# Altium PCB MiniPC.PcbDoc (part 20 of 24)
Units mm, origin at the board's own origin, x right, y up, seen from the top; angles counter-clockwise.
Board outline 175 x 155 mm, 16 copper layers (1_Top, 2_int1_(gnd), 3_int2_(power), 4_int3_(gnd), 5_int4_(sign), 6_int5_(power), 7_int6_(sign), 8_int7_(power), 9_int8_(gnd), 10_int9_(sign), 11_int10_(gnd), 12_int11_(sign), 13_int12_(gnd), 14_int13_(power), 15_int14_(gnd), 16_Bottom), stack 2.008 mm thick; 1046 components, 837 nets, 6010 pads, 4009 vias.
Unrouted connection lines stored in the file: 564.
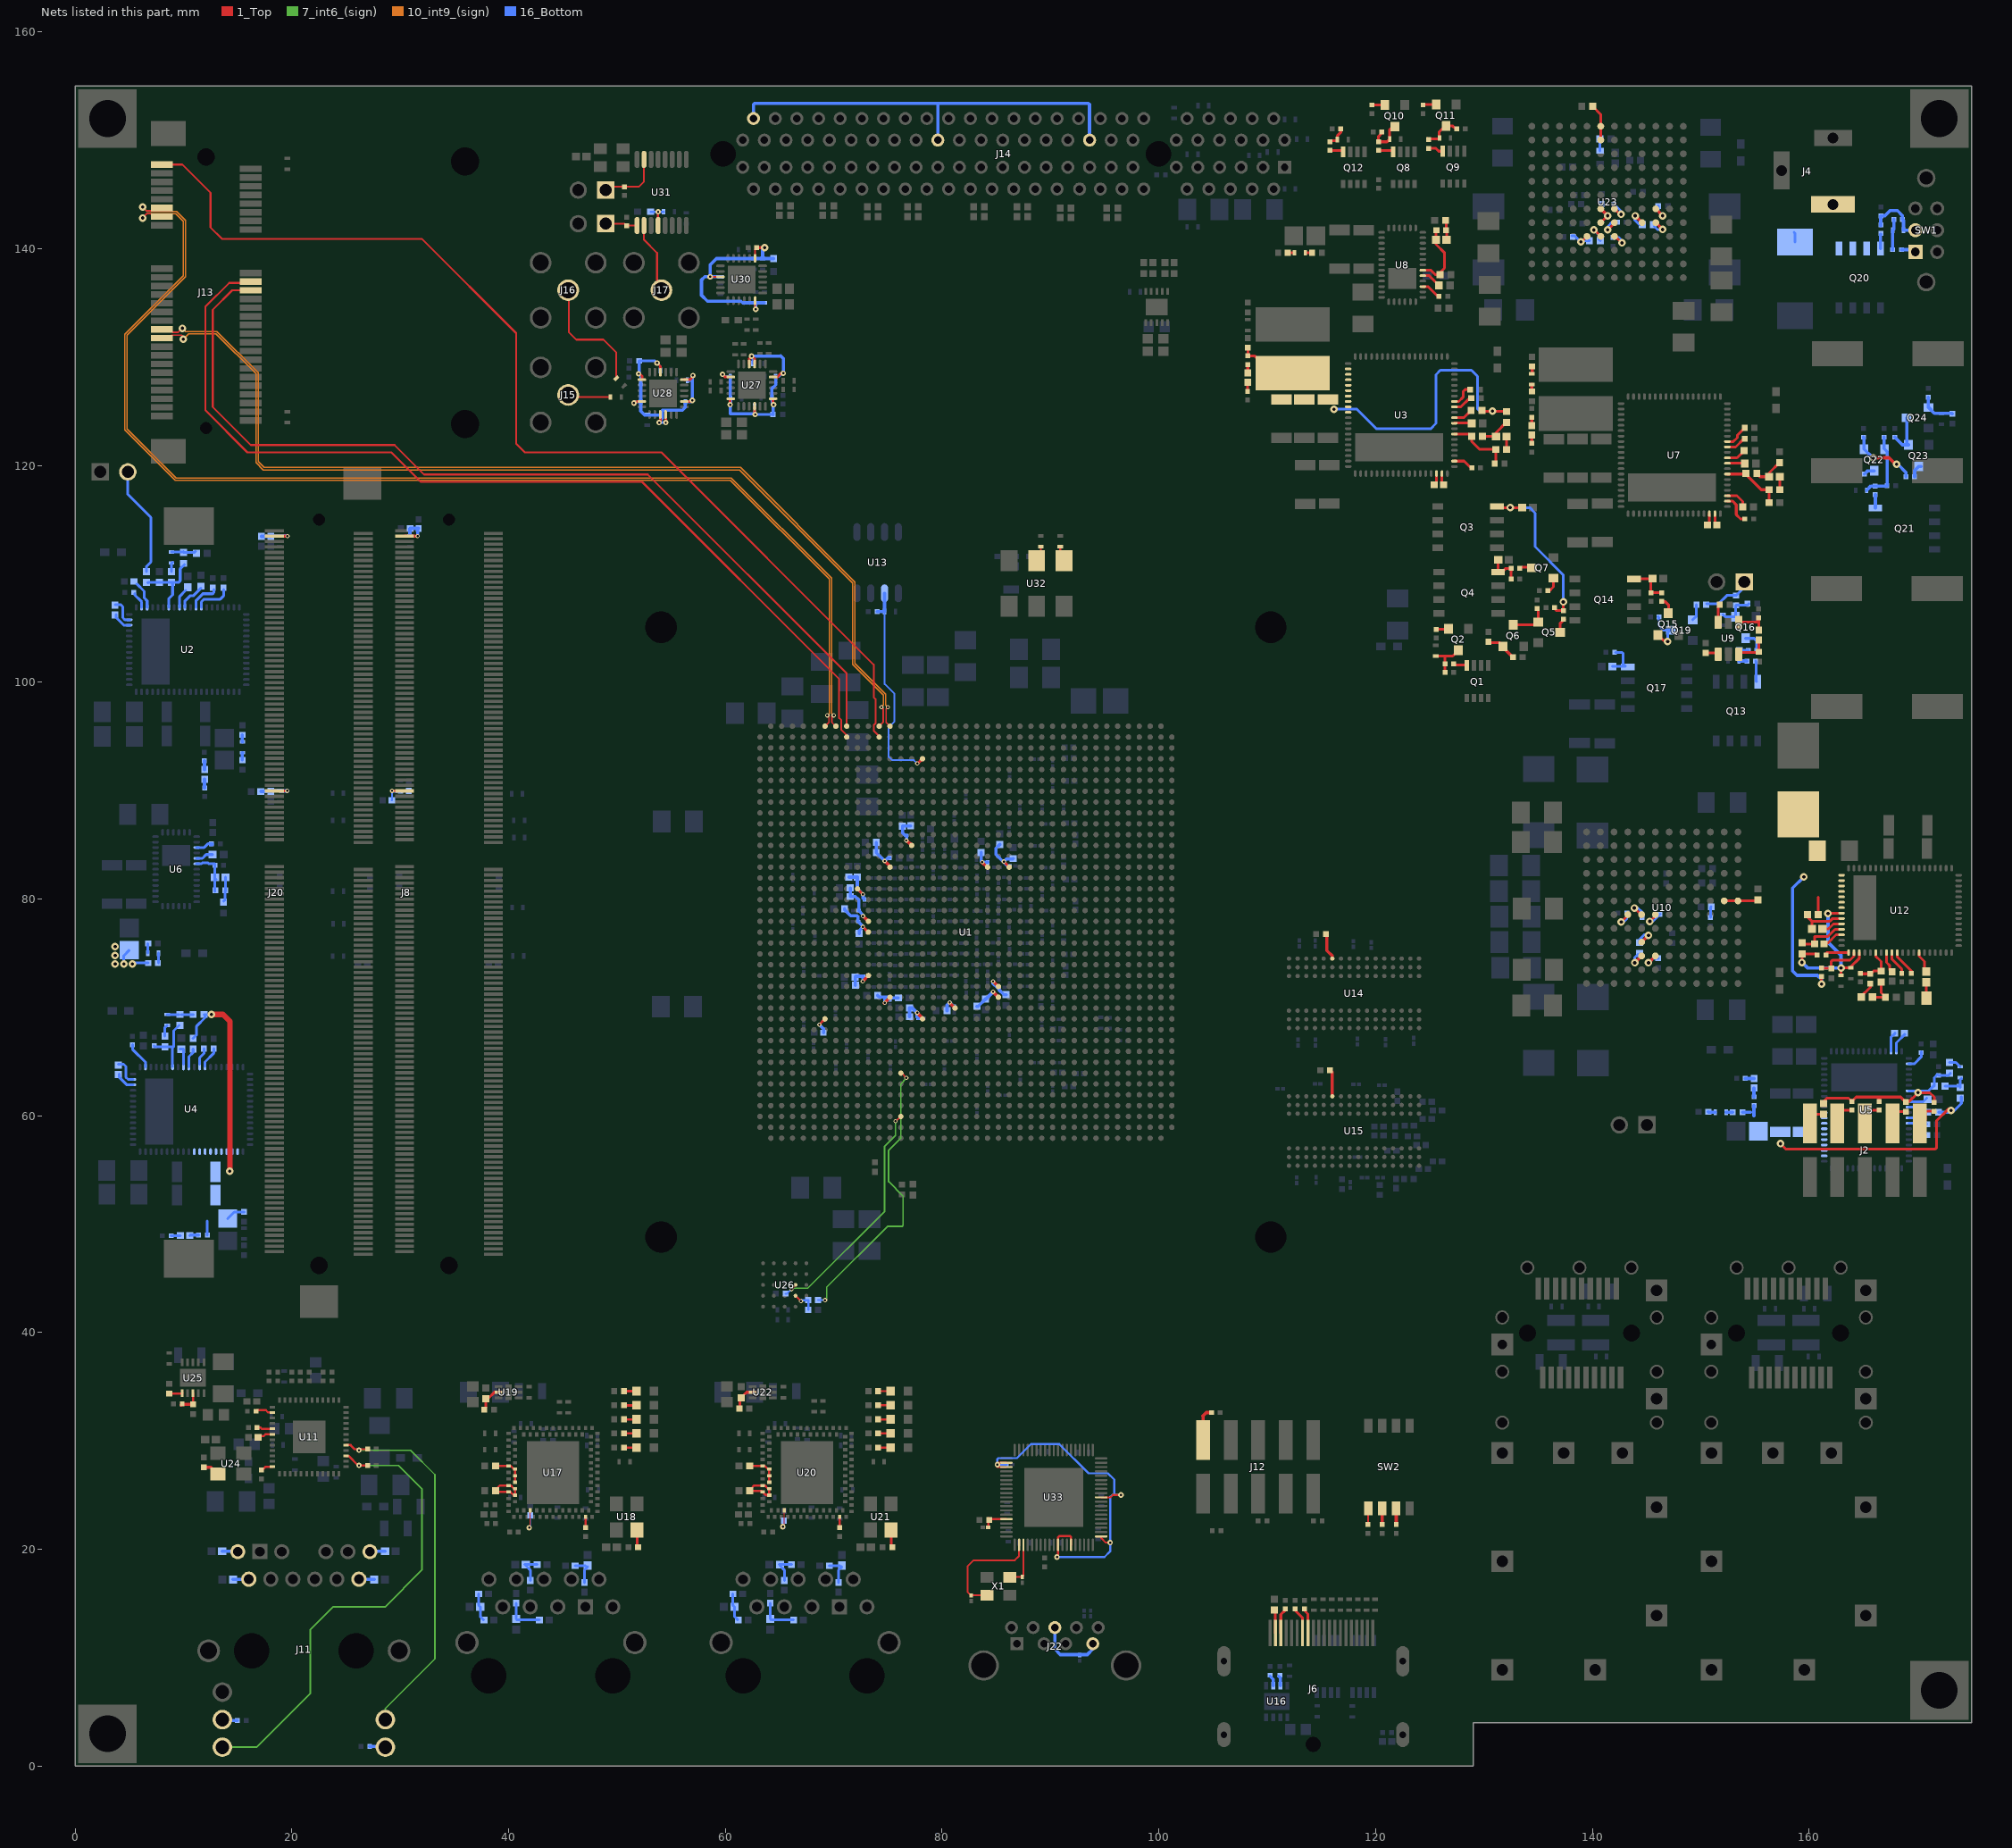
[diagram p32: the nets of this part, all layers, seen from the top]

## Via types
v1: diameter 0.4, hole 0.2, 1_Top to 16_Bottom, tented both sides, 1658 vias
v2: diameter 0.5, hole 0.2, 1_Top to 16_Bottom, tented both sides, 1014 vias
v3: diameter 0.7, hole 0.3, 1_Top to 16_Bottom, tented both sides, 915 vias
v4: diameter 0.6, hole 0.2, 1_Top to 16_Bottom, tented both sides, 278 vias
v5: diameter 0.4, hole 0.2, 1_Top to 16_Bottom, 93 vias
v6: diameter 0.4/0/0/0/0/0/0/0/0/0/0/0/0/0/0/0.4 (per signal layer), hole 0.2, 1_Top to 16_Bottom, tented both sides, 18 vias
v7: diameter 0.4/0/0/0/0/0/0/0/0/0/0/0.4/0.4/0.4/0.4/0.4 (per signal layer), hole 0.2, 1_Top to 16_Bottom, tented both sides, 16 vias
v8: diameter 0.5, hole 0.254, 1_Top to 16_Bottom, tented both sides, 15 vias
v9: diameter 0.5, hole 0.2, 1_Top to 16_Bottom, 2 vias

## Nets (pads, with @x,y where several pads share a name; then routed paths per layer and width w, separated by ;. In a path a pad name is that pad's centre, name@x,y a point inside that pad or via, vN(x,y) a via of type N, cw(c..) or ccw(c..) an arc to the next point about the centre after c; other vN are vias at no path point) (continued)
MINIPCIE_PERST_L: J13.22 U1.A9 | length 86.7
  1_Top w0.17: J13.22@16.2,136.15 14.5,136.15 12.705,134.355 12.705,125.395 16.22,121.88 29.482,121.88 32.202,119.16 52.84,119.16 71.194,100.806 U1.A9@71.194,95.939
MINIPCIE_PET_N: J13.31 U1.A13 | length 93.5
  1_Top w0.1: v1@74.902,97.602 v1(75,97.7)
  1_Top w0.15: J13.31@8,132.55 8.75,132.55 9.015,132.285 9.535,132.285 v3(9.9,132.65) ; v1@74.902,97.602 74.829,97.529 74.829,96.304 U1.A13@75.194,95.939
  10_int9_(sign) w0.11: v3(9.9,132.65) 10.19,132.36 13.09,132.36 16.9,128.55 16.9,120.35 17.45,119.8 61.387,119.8 71.945,109.242 71.945,101.752 74.805,98.892 74.805,97.895 v1(75,97.7)
MINIPCIE_PET_P: J13.33 U1.A12 | length 93.4
  1_Top w0.1: v3(10,131.65) v3@10,131.84 ; v1(74.4,97.7) v1@74.505,97.595
  1_Top w0.15: J13.33@8,131.75 8.65,131.75 8.915,132.015 9.825,132.015 v3@10,131.84 ; U1.A12@74.194,95.939 74.559,96.304 74.559,97.541 v1@74.505,97.595
  10_int9_(sign) w0.11: v3@10,131.74 v3(10,131.65) 10.5,132.15 13.003,132.15 16.69,128.463 16.69,120.263 17.363,119.59 61.3,119.59 71.735,109.155 71.735,101.665 74.595,98.805 74.595,97.895 v1(74.4,97.7)
MINIPCIE_REFCLK_N: J13.11 U1.A8 | length 112.8
  1_Top w0.1: 69.804,96.9 69.843,96.939 v1(70,96.939)
  1_Top w0.15: v3(6.225,143.85) 6.59,143.485 6.985,143.485 7.25,143.75 J13.11@8,143.75 ; v1@69.829,96.9 69.829,96.304 U1.A8@70.194,95.939
  10_int9_(sign) w0.11: v3(6.225,143.85) 6.665,143.41 9.387,143.41 10.21,142.587 10.21,137.41 4.8,132 4.8,123.361 9.321,118.84 60.552,118.84 69.805,109.587 69.805,97.134 v1(70,96.939)
MINIPCIE_REFCLK_P: J13.13 U1.A7 | length 112.4
  1_Top w0.1: v1(69.4,96.939) 69.545,96.939 v1@69.584,96.9
  1_Top w0.15: v3(6.25,142.825) 6.25,142.84 6.625,143.215 6.985,143.215 7.25,142.95 J13.13@8,142.95 ; U1.A7@69.194,95.939 69.559,96.304 v1@69.559,96.9
  10_int9_(sign) w0.11: v3(6.25,142.825) 6.625,143.2 9.3,143.2 10,142.5 10,137.497 4.59,132.087 4.59,123.274 9.234,118.63 60.465,118.63 69.595,109.5 69.595,97.134 v1(69.4,96.939)
MINIPCIE_W_DISABLE_L: J13.20 U1.B9 | length 89.1
  1_Top w0.17: J13.20@16.2,136.95 16.08,136.83 14.218,136.83 12.025,134.637 12.025,125.075 15.9,121.2 29.2,121.2 31.92,118.48 52.32,118.48 70.5,100.3 70.5,96.7 70.7,96.5 70.7,95.6 71.194,95.106 U1.B9@71.194,94.939
MINIPCIE_WAKE_L: J13.1 U1.B12 | length 99.7
  1_Top w0.17: J13.1@8,147.75 9.9,147.75 12.5,145.15 12.5,141.95 13.55,140.9 32,140.9 40.7,132.2 40.7,122 41.5,121.2 54.1,121.2 73.694,101.606 73.694,98.603 73.86,98.436 73.86,96.207 73.7,96.047 73.7,95.5 74.194,95.006 U1.B12@74.194,94.939
NetC1_1: C1.1 Q2.3 R2.1 R3.2 | length 3.8
  1_Top w0.25: C1.1@125.55,102.41 126.442,102.41 ; R3.2@126.4,100.9 R2.1@126.4,101.7 126.4,102.368 126.442,102.41 ; Q2.3@127.63,102.94 127.1,102.41 126.442,102.41
NetC2_2: C2.2 Q3.4 R5.1 R6.2 | length 16.5
  1_Top w0.25: Q3.4@131.01,116.2 131.11,116.1 v3(132.41,116.1) C2.2@133.52,116.1 ; R5.1@136.41,106.9 136.71,106.6 R6.2@137.31,106.6 v3(137.31,107.4)
  16_Bottom w0.25: v3@132.11,116.1 v3(132.41,116.1) 134.21,116.1 134.71,115.6 134.71,112.5 137.31,109.9 v3(137.31,107.4)
NetC3_2: C3.2 Q4.4 R8.1 R11.2 | length 3.2
  1_Top w0.25: Q4.4@131.293,110.155 131.293,111.283 C3.2@131.31,111.3 ; Q4.4@131.51,110 132.01,110.5 R11.2@132.5,110.5 ; R8.1@132.5,109.5 132.5,110.29 R11.2@132.51,110.3
NetC4_1: C4.1 Q10.3 R14.1 R16.2 | length 3.6
  1_Top w0.25: R16.2@120.57,150.65 120.27,150.35 R14.1@120.27,149.85 121.05,149.85 C4.1@121.3,150.1 121.3,150.98 Q10.3@121.77,151.45
NetC5_1: C5.1 Q11.3 R15.1 R17.2 | length 3.5
  1_Top w0.25: R15.1@124.77,150.15 124.82,150.1 125.8,150.1 C5.1@125.9,150.2 ; C5.1@125.87,150.25 125.87,150.77 126.4,151.3 Q11.3@126.5,151.3 127.12,151.3 R17.2@127.37,151.05
NetC6_1: C6.1 R19.1 R20.2 | length 2
  1_Top w0.25: R19.1@115.77,149.85 115.87,149.95 116.37,149.95 C6.1@116.47,150.05 116.47,150.42 116.8,150.75 116.8,150.92 R20.2@116.67,151.05
NetC7_1: C7.1 R25.1 | length 0.7
  16_Bottom w0.3: R25.1@15.44,92.82 15.44,93.48 C7.1@15.45,93.49
NetC7_2: C7.2 R23.1 | length 0.6
  16_Bottom w0.3: R23.1@15.44,95.13 15.44,94.5 C7.2@15.45,94.49
NetC8_1: C8.1 R24.1 R26.2 | length 2.3
  16_Bottom w0.25: C8.1@8.9,112 9.94,112 R24.1@10,112.06 ; R24.1@10,111.96 11,111.96 R26.2@11.1,112.06
NetC8_2: C8.2 R22.1 | length 0.9
  16_Bottom w0.25: R22.1@8.9,110.2 8.9,110.96 C8.2@9,111.06
NetC13_1: C13.1 R28.2 | length 0.8
  16_Bottom w0.3: R28.2@11.94,92.74 11.94,91.94 C13.1@11.95,91.93
NetC13_2: C13.2 R30.2 | length 0.8
  16_Bottom w0.3: C13.2@11.95,91.05 11.95,90.26 R30.2@11.96,90.25
NetC14_2: C14.2 U2.57 | length 1.8
  16_Bottom w0.25: U2.57@9.65,106.91 9.65,107.91 C14.2@10.2,108.46
NetC15_1: C15.1 U2.47 | length 2.5
  16_Bottom w0.25: C15.1@3.7,107.16 4.2,107.16 4.4,106.96 4.4,105.96 4.6,105.76 U2.47@5.055,105.76
NetC15_2: C15.2 U2.46 | length 1.8
  16_Bottom w0.25: C15.2@3.8,106.26 3.8,105.96 4.5,105.26 4.8,105.26 U2.46@5.055,105.26
NetC16_1: C16.1 R38.2 | length 0.8
  1_Top w0.25: C16.1@108.19,128.55 108.2,128.56 R38.2@108.2,129.31
NetC16_2: C16.2 R40.2 | length 0.9
  1_Top w0.25: R40.2@108.18,126.82 108.19,126.83 C16.2@108.19,127.67
NetC17_1: C17.1 R39.1 R41.2 | length 3.1
  1_Top w0.25: R39.1@129.79,122.47 129.99,122.67 C17.1@131.1,122.67 131.1,123.005 R41.2@132.065,123.97
NetC17_2: C17.2 R37.1 | length 1.2
  1_Top w0.25: C17.2@132.08,122.67 132.08,121.48 R37.1@132.09,121.47
NetC20_2: C20.2 C21.2 C22.2 R38.1 R41.1 R42.2 R43.2 R45.2 U3.20 U3.21 U3.22 U3.23 U3.24 U3.25 U3.26 U3.27 U3.28 | length 31.5
  1_Top w0.25: R45.2@108.21,130.85 108.21,130.12 R38.1@108.2,130.11 108.81,130.11 110.41,128.51 R42.2@112.34,128.51 ; R43.2@129.795,125.06 R43.2@129.861,124.995 ; R43.2@129.886,124.97 R43.2@129.861,124.995 ; R41.1@132.065,124.97 130.79,124.97 v3(130.765,124.995) R43.2@129.861,124.995
  16_Bottom w0.25: v3(116.14,125.18) 118.28,125.18 120.09,123.37 125.065,123.37 125.565,123.87 125.565,128.37 125.965,128.77 128.835,128.77 129.394,128.211 129.394,125.208 129.607,124.995 v3(130.765,124.995)
NetC24_2: C24.2 U3.65 | length 1.6
  1_Top w0.25: U3.65@127.24,123.91 128.64,123.91 C24.2@128.78,123.77
NetC25_1: C25.1 U3.55 | length 1.1
  1_Top w0.25: U3.55@126.09,119.26 126.09,118.4 C25.1@126.28,118.21
NetC25_2: C25.2 U3.54 | length 1.1
  1_Top w0.25: C25.2@125.4,118.21 125.59,118.4 U3.54@125.59,119.26
NetC27_1: C27.1 R52.1 R54.2 | length 2.2
  16_Bottom w0.25: C27.1@8.495,69.35 R52.1@9.595,69.35 ; R52.1@9.795,69.35 R54.2@10.895,69.35
NetC27_2: C27.2 R50.1 | length 1.1
  16_Bottom w0.25: R50.1@8.295,67.35 8.295,68.15 C27.2@8.495,68.35
NetC30_2: C30.2 C31.2 R51.2 R54.1 R55.2 R56.1 R57.2 U4.16 U4.17 U4.18 U4.19 U4.20 U4.21 U4.22 U4.23 U4.24 | length 22.2
  1_Top w0.5: v3(12.595,69.35) 13.65,69.35 14.3,68.7 14.3,54.9 v3(14.28,54.88)
  16_Bottom w0.25: R57.2@10.895,67.15 11.22,67.475 11.22,68.275 11.995,69.05 R54.1@11.995,69.35 ; R54.1@11.895,69.35 R54.1@11.995,69.35 ; R56.1@12.2,49 12.2,50.31 ; v3(12.595,69.35) R54.1@11.995,69.35 ; R55.2@14.08,50.515 14.695,51.13 R51.2@15.6,51.13
NetC32_1: C32.1 R56.2 | length 0.8
  16_Bottom w0.25: C32.1@10.59,48.95 10.64,49 R56.2@11.4,49
NetC32_2: C32.2 R58.2 | length 0.9
  16_Bottom w0.25: R58.2@8.86,48.94 8.87,48.95 C32.2@9.71,48.95
NetC33_2: C33.2 U4.57 | length 1.7
  16_Bottom w0.25: C33.2@9.695,66.14 C33.2@9.795,66.14 9.995,66.14 U4.57@9.995,64.75
NetC34_1: C34.1 U4.47 | length 2.5
  16_Bottom w0.25: C34.1@3.995,64.75 4.495,64.75 4.695,64.55 4.695,63.55 4.895,63.35 U4.47@5.35,63.35
NetC34_2: C34.2 U4.46 | length 1.8
  16_Bottom w0.25: C34.2@4.095,63.85 4.095,63.55 4.795,62.85 5.095,62.85 U4.46@5.35,62.85
NetC35_1: C35.1 R67.1 | length 0.6
  16_Bottom w0.3: R67.1@150.69,60.36 150.71,60.34 C35.1@151.33,60.34
NetC35_2: C35.2 R65.1 | length 0.6
  16_Bottom w0.3: C35.2@152.33,60.34 R65.1@152.95,60.34
NetC36_1: C36.1 R66.1 R68.2 | length 2.2
  16_Bottom w0.25: R66.1@172.535,62.73 173.735,62.73 R68.2@173.835,62.83 ; R68.2@173.935,62.63 173.935,63.33 C36.1@174.035,63.43
NetC36_2: C36.2 R64.1 | length 1.2
  16_Bottom w0.25: R64.1@172.935,64.93 173.535,64.93 C36.2@173.935,64.53
NetC39_2: C39.2 C40.2 R65.2 R68.1 R69.2 R70.1 R71.2 U5.16 U5.17 U5.18 U5.19 U5.20 U5.21 U5.22 U5.23 U5.24 | length 24
  1_Top w0.25: v3@157.343,57.423 157.835,56.93 171.635,56.93 171.735,57.03 171.735,59.53 172.835,60.63 172.94,60.63 v3(173.08,60.49)
  16_Bottom w0.25: R71.2@171.935,60.33 173.235,60.33 v3@173.395,60.49 ; v3(173.08,60.49) v3@173.395,60.49 ; R68.1@174.035,61.73 174.035,61.13 v3@173.395,60.49
  16_Bottom w0.3: R65.2@153.85,60.34 154.58,60.34 ; 154.9,60.02 R70.1@154.9,60.95
  other v3: 157.35,57.43
NetC41_1: C41.1 R70.2 | length 0.8
  16_Bottom w0.3: R70.2@154.9,61.75 154.9,62.55 C41.1@154.91,62.56
NetC41_2: C41.2 R72.2 | length 0.8
  16_Bottom w0.3: R72.2@154.1,63.45 154.11,63.44 C41.2@154.91,63.44
NetC42_2: C42.2 U5.57 | length 1.8
  16_Bottom w0.25: U5.57@169.185,61.306 170.511,61.306 C42.2@170.835,61.63
NetC43_1: C43.1 U5.47 | length 1.9
  16_Bottom w0.25: U5.47@168.035,65.956 168.035,66.73 C43.1@168.835,67.53
NetC43_2: C43.2 U5.46 | length 1.8
  16_Bottom w0.25: U5.46@167.535,65.956 167.535,67.23 C43.2@167.935,67.63
NetC44_1: C44.1 R84.1 | length 0.9
  16_Bottom w0.25: C44.1@6.7,75 R84.1@6.7,75.9
NetC44_2: C44.2 R82.1 | length 0.9
  16_Bottom w0.25: R82.1@7.7,74.1 C44.2@7.7,75
NetC48_1: C48.1 R86.1 R88.2 U6.31 | length 4.5
  16_Bottom w0.25: U6.31@11.225,83.25 11.666,83.25 11.741,83.325 12.259,83.325 12.319,83.265 12.9,83.265 R88.2@12.9,83.1 12.9,81.9 C48.1@12.91,81.89 ; R86.1@12.9,80.7 12.91,80.71 C48.1@12.91,81.89 ; C48.1@12.91,82 C48.1@12.91,81.89 ; C48.1@13,81.8 C48.1@12.91,81.89
NetC48_2: C48.2 R85.2 R86.2 | length 2.4
  16_Bottom w0.25: R85.2@13.7,79.8 13.85,79.95 R86.2@13.85,80.8 ; C48.2@13.89,82 13.89,80.71 R86.2@13.9,80.7
NetC49_2: C49.2 U6.30 | length 1.6
  16_Bottom w0.25: U6.30@11.225,83.75 11.75,83.75 12.1,84.1 C49.2@12.69,84.1 C49.2@12.7,84.1
NetC50_1: C50.1 R92.2 | length 0.8
  1_Top w0.3: C50.1@134.41,123.69 R92.2@134.41,124.45
NetC50_2: C50.2 R94.2 | length 0.8
  1_Top w0.3: R94.2@134.41,122.03 C50.2@134.41,122.81
NetC51_1: C51.1 R93.1 R95.2 | length 3
  1_Top w0.25: C51.1@156.305,118.96 156.305,119.295 R95.2@157.27,120.26
  1_Top w0.3: R93.1@155.17,119.26 155.47,118.96 C51.1@156.305,118.96
NetC51_2: C51.2 R91.1 | length 1.2
  1_Top w0.25: C51.2@157.285,118.96 157.285,117.77 R91.1@157.295,117.76
NetC57_1: C57.1 R99.1 | length 0.6
  1_Top w0.3: C57.1@134.41,127.46 134.41,126.83 R99.1@134.42,126.82
NetC57_2: C57.2 R98.1 | length 0.7
  1_Top w0.3: C57.2@134.41,128.46 134.43,128.48 R98.1@134.43,129.12
NetC58_2: C58.2 U7.65 | length 1.6
  1_Top w0.25: U7.65@152.445,120.2 153.845,120.2 C58.2@153.985,120.06
NetC59_1: C59.1 U7.55 | length 1.1
  1_Top w0.25: U7.55@151.295,115.55 151.295,114.69 C59.1@151.485,114.5
NetC59_2: C59.2 U7.54 | length 1.1
  1_Top w0.25: C59.2@150.605,114.5 150.795,114.69 U7.54@150.795,115.55
NetC60_1: C60.1 R106.1 | length 0.6
  1_Top w0.25: C60.1@113.52,139.62 114.12,139.62 R106.1@114.13,139.61
NetC60_2: C60.2 R104.1 | length 0.6
  1_Top w0.25: R104.1@111.89,139.61 112.51,139.61 C60.2@112.52,139.62
NetC64_1: C64.1 R108.1 R110.2 U8.31 | length 6.3
  1_Top w0.25: U8.31@124.35,138 125.1,138 125.5,137.6 R110.2@125.95,137.6 125.95,137.8 126.35,138.2 126.35,139.59 126.36,139.6 125.56,140.4 C64.1@125.56,140.8 125.56,141.51 R108.1@125.65,141.6
NetC64_2: C64.2 R107.2 R108.2 | length 1.8
  1_Top w0.25: R107.2@126.45,142.7 126.5,142.65 R108.2@126.5,141.7 R108.2@126.5,141.5 ; C64.2@126.54,140.8 126.55,140.81 126.55,141.4 126.54,141.39
NetC65_2: C65.2 U8.30 | length 1.4
  1_Top w0.25: U8.30@124.35,137.5 124.95,137.5 C65.2@125.55,136.9
NetC66_1: C66.1 R112.1 R114.1 R116.2 | length 2.6
  16_Bottom w0.3: R114.1@154.25,101.94 154.23,101.96 C66.1@153.52,101.96 153.56,102 R112.1@153.56,102.93 153.58,102.91 R116.2@154.38,102.91
NetC67_2: C67.2 Q14.4 R115.1 R117.2 | length 4.3
  1_Top w0.25: Q14.4@143.545,109.55 C67.2@145.555,109.55 ; C67.2@145.445,109.45 145.395,109.4 R115.1@145.395,108.25 R117.2@146.445,108.25
NetC68_2: C68.2 Q16.1 R118.1 R119.2 | length 3.5
  16_Bottom w0.25: C68.2@152.045,106.25 152.245,106.05 Q16.1@153.195,106.05 153.195,107 R118.1@153.245,107.05 ; R118.1@153.245,107.1 154.295,107.1 R119.2@154.445,107.25
NetC70_2: C70.2 Q17.4 R125.1 | length 3.2
  16_Bottom w0.25: C70.2@141.835,101.45 143.045,101.45 142.845,101.65 142.845,102.65 142.745,102.75 R125.1@142.145,102.75
NetC73_1: C73.1 R129.1 R130.1 R131.2 SW1.2 | length 5.8
  16_Bottom w0.3: R130.1@166.6,142.1 R130.1@166.6,142.2 R131.2@166.6,143.018 166.918,143.018 166.931,143.031 167,143.031 167.469,143.5 168.131,143.5 168.6,143.031 R129.1@168.6,142.7 168.7,142.6 C73.1@168.7,141.7 SW1.2@169.8,141.7
NetC73_2: C73.2 D1.2 J4.1 Q20.1 Q20.2 Q20.3 R128.2 R129.2 | length 4.6
  16_Bottom w0.254: D1.2@158.6,141.5 158.7,141.4 D1.2@158.7,140.6 ; J4.1@162.2,144.079 J4.1@162.76,143.519
  16_Bottom w0.3: R128.2@167.7,139.9 C73.2@167.7,141.7 167.8,141.8 R129.2@167.8,142.7
NetC78_1: C78.1 Q22.2 R132.1 R136.1 R137.2 | length 6.7
  16_Bottom w0.3: C78.1@165.3,117.7 165.7,118.1 R136.1@166.1,118.1 167.2,118.1 167.2,121.25 Q22.2@166.95,121.5 166.9,121.55 R132.1@166.9,122.6
NetC79_2: C79.2 Q24.1 R139.2 R140.2 | length 3.4
  16_Bottom w0.3: R139.2@171,126.3 Q24.1@171,125.35 171.55,124.8 C79.2@172.2,124.8 173.15,124.8 R140.2@173.2,124.75
NetC94_1: C94.1 R152.2 | length 1
  16_Bottom w0.25: R152.2@150.89,78.295 150.89,79.235 C94.1@150.95,79.295
NetC107_1: C107.1 R169.2 | length 1.1
  16_Bottom w0.254: C107.1@140.7,149.025 R169.2@140.7,150.125
NetC108_1: C108.1 R175.2 | length 1.6
  1_Top w0.25: C108.1@164.734,70.95 165.634,71.85 R175.2@165.634,72.2
NetC108_2: C108.2 R173.1 R174.2 | length 2.8
  1_Top w0.25: C108.2@165.834,70.95 C108.2@165.844,70.95 R173.1@167.034,70.95 166.634,71.35 R174.2@166.634,72.35
NetC109_2: C109.2 C114.1 R172.1 R176.2 U12.42 U12.51 | length 16.1
  1_Top w0.25: v3(159.334,74.15) R172.1@159.334,74.95 160.634,74.95 R176.2@160.734,74.85 ; v3@161.634,78.65 161.685,78.7 U12.42@162.985,78.7 ; C109.2@162.934,72.95 v3@162.934,73.55 ; v3(162.934,73.65) 163.734,73.65 163.784,73.7 164.634,74.55 U12.51@164.634,75.05
  16_Bottom w0.3: v3(159.334,74.15) 159.834,73.65 v3(162.934,73.65) 162.934,74.806 161.734,76.006 v3(161.734,78.65)
NetC110_2: C110.2 U12.56 | length 1.7
  1_Top w0.25: U12.56@167.134,75.05 167.134,74.15 167.434,73.85 C110.2@167.434,73.45
NetC111_1: C111.1 U12.44 | length 1.9
  1_Top w0.25: C111.1@161.224,77.25 161.784,77.25 162.234,77.7 U12.44@162.984,77.7
NetC111_2: C111.2 R178.2 U12.43 | length 4.2
  1_Top w0.25: R178.2@159.934,78.45 159.934,78.25 160.235,77.95 ; C111.2@160.244,77.25 160.244,77.94 160.235,77.95 ; U12.43@162.984,78.2 162.168,78.2 161.918,77.95 160.235,77.95
NetC115_1: C115.1 U12.46 | length 2
  1_Top w0.25: C115.1@161.334,75.95 161.734,75.95 162.484,76.7 U12.46@162.984,76.7
NetC115_2: C115.2 R172.2 U12.45 | length 4.4
  1_Top w0.25: R172.2@159.534,75.85 160.434,75.85 160.514,75.93 160.514,76.55 161.734,76.55 162.384,77.2 U12.45@162.984,77.2
NetC116_2: C116.2 F1.1 R178.1 R179.1 U12.35 U12.36 U12.37 U12.38 U12.39 U12.40 U12.41 | length 14.8
  1_Top w0.25: R178.1@160.834,78.55 160.834,80.15 ; v3(161.134,72.15) R179.1@161.134,72.85
  16_Bottom w0.3: v3(159.51,82.05) 158.47,81.01 158.47,73.37 158.88,72.96 160.745,72.96 161.134,72.571 v3(161.134,72.15)
NetC117_1: C117.1 R183.2 | length 1.5
  1_Top w0.25: C117.1@170.805,72.32 170.805,70.879 R183.2@170.834,70.85
NetC117_2: C117.2 U12.62 | length 1.8
  1_Top w0.25: U12.62@170.135,75.05 170.134,74.734 170.634,74.234 C117.2@170.634,73.45
NetC118_2: C118.2 R195.2 U1.AG19 | length 2.2
  1_Top w0.3: v1(80.7,70.467) 80.7,70.433 U1.AG19@81.194,69.939
  16_Bottom w0.3: R195.2@80.45,69.7 80.45,70.217 v1(80.7,70.467) 81.107,70.06 C118.2@81.125,70.06
NetC119_2: C119.2 R196.2 U1.AE23 | length 2.6
  1_Top w0.3: v1(84.7,72.4) 85.161,71.939 U1.AE23@85.194,71.939
  16_Bottom w0.3: v1(84.7,72.4) 84.7,72.216 85.081,71.835 C119.2@85.2,71.835 ; C119.2@85.24,71.85 85.24,71.635 85.7,71.175 R196.2@85.9,71.175
NetC120_2: C120.2 R184.1 R197.2 U1.AF23 | length 3.5
  1_Top w0.3: v1(84.7,71.439) 84.7,71.433 U1.AF23@85.194,70.939
  16_Bottom w0.3: R184.1@83.2,70.1 83.325,70.1 R197.2@84,70.775 84.04,70.775 84.7,71.435 C120.2@85.2,70.935
NetC121_2: C121.2 R185.1 R198.2 U1.P24 | length 4.4
  1_Top w0.3: v1(85.7,83.45) 86.194,82.956 U1.P24@86.194,82.939
  16_Bottom w0.3: R198.2@85.325,85.025 84.975,84.675 84.975,84.1 85.625,83.45 v1(85.7,83.45) ; C121.2@86.2,83.065 86.021,83.065 85.7,83.386 v1(85.7,83.45) ; R185.1@86.55,83.725 86.5,83.675 85.925,83.675 v1(85.7,83.45)
NetC122_2: C122.2 R186.1 U1.P22 | length 2.1
  1_Top w0.3: v1(83.7,83.4) 83.7,83.375 84.136,82.939 U1.P22@84.194,82.939
  16_Bottom w0.3: R186.1@83.6,84.3 83.6,83.5 v1(83.7,83.4) 83.71,83.39 C122.2@84.2,83.39
NetC123_2: C123.2 R187.1 R199.2 U1.AH16 | length 3
  1_Top w0.3: v1(77.7,69.5) 78.194,69.006 U1.AH16@78.194,68.939
  16_Bottom w0.3: R199.2@77,69.15 R187.1@77,69.95 77.25,69.95 v1(77.7,69.5) 77.7,69.115 C123.2@77.815,69
NetC124_2: C124.2 R188.1 R200.2 U1.AF13 | length 3.4
  1_Top w0.3: v1@74.676,70.4 v1(74.705,70.428) 74.705,70.45 U1.AF13@75.194,70.939
  16_Bottom w0.3: R200.2@74.05,71.1 74.2,70.95 74.725,70.95 ; v1(74.705,70.428) 74.725,70.449 74.725,70.95 ; R188.1@75.95,70.875 75.34,70.875 C124.2@75.175,70.71 74.935,70.95 74.725,70.95
NetC125_2: C125.2 R189.1 R201.2 U1.AD11 | length 2.8
  1_Top w0.3: v1(72.679,72.404) 72.679,72.424 U1.AD11@73.194,72.939
  16_Bottom w0.3: R201.2@72,72.05 71.975,72.075 R189.1@71.975,72.8 72.05,72.875 C125.2@72.715,72.875 72.679,72.839 v1(72.679,72.404)
NetC126_2: C126.2 R190.1 R202.2 U1.Y11 | length 4.2
  1_Top w0.25: v1(72.694,77.439) U1.Y11@73.194,76.939
  16_Bottom w0.3: R202.2@71,79.1 71,79.016 71.566,78.45 72.15,78.45 72.25,78.35 72.25,77.935 C126.2@72.26,77.925 72.694,77.491 v1(72.694,77.439) 72.35,77.096 R190.1@72.35,76.825
NetC127_2: C127.2 R191.1 R203.2 U1.W11 | length 4.1
  1_Top w0.3: v1(72.7,78.425) 72.708,78.425 U1.W11@73.194,77.939
  16_Bottom w0.3: R203.2@71.525,81.025 R191.1@71.525,80.225 72,80.225 72.31,79.915 C127.2@72.31,78.925 72.7,78.535 v1(72.7,78.425)
NetC128_2: C128.2 R192.1 R204.2 U1.T10 | length 3.8
  1_Top w0.25: U1.T10@72.194,80.939 v1(72.694,80.439)
  16_Bottom w0.3: R204.2@71.4,82.025 R192.1@72.175,82.025 72.175,80.975 72.694,80.456 v1(72.694,80.439) 72.71,80.423 72.71,80.075 C128.2@72.825,79.96
NetC129_2: C129.2 R193.1 R205.2 U1.P13 | length 3.4
  1_Top w0.3: v1(74.7,83.5) 75.194,83.006 U1.P13@75.194,82.939
  16_Bottom w0.3: R205.2@73.925,85.225 R193.1@73.925,84.3 73.925,84.275 v1(74.7,83.5) 74.99,83.79 C129.2@75.175,83.79
NetC130_2: C130.2 R194.2 R206.2 U1.M15 | length 3
  1_Top w0.3: v1(76.7,85.4) 76.733,85.4 U1.M15@77.194,84.939
  16_Bottom w0.3: v1(76.7,85.4) 76.715,85.415 C130.2@76.715,85.875 76.575,85.875 76.35,86.1 76.35,86.75 R194.2@77.1,86.75
NetC131_2: C131.2 R207.2 U1.D16 U13.6 | length 19.9
  1_Top w0.3: v1(77.7,92.5) 77.755,92.5 U1.D16@78.194,92.939
  16_Bottom w0.17: C131.2@74.7,106.5 74.7,99.825 75.6,98.925 75.6,96.375 75.075,95.85 75.075,93.125 75.4,92.8 77.4,92.8 v1(77.7,92.5)
  16_Bottom w0.3: R207.2@74,106.5 C131.2@74.7,106.5 74.685,106.515 U13.6@74.685,108.2
NetC288_2: C288.2 J8.164 R227.2 R228.2 | length 3.6
  1_Top w0.25: v1(29.25,89.975) J8.164@30.4,89.975
  16_Bottom w0.17: R227.2@29.225,89.1 29.25,89.125 v1(29.25,89.975) 29.325,89.9 C288.2@30.025,89.9 30.1,89.975 R228.2@30.8,89.975
NetC289_1: C289.1 J8.258 R229.2 R230.2 | length 3.4
  1_Top w0.25: J8.258@30.4,113.475 v1(31.602,113.475)
  16_Bottom w0.3: C289.1@30.9,113.5 30.9,114.175 R230.2@30.925,114.2 31.675,114.2 R229.2@31.7,114.175 31.602,114.077 v1(31.602,113.475)
NetC295_1: C295.1 J20.164 R232.2 R233.2 | length 3.6
  1_Top w0.25: J20.164@18.4,89.975 v1(19.572,89.975)
  16_Bottom w0.3: R232.2@17.15,89.9 17.175,89.925 R233.2@18.071,89.925 18.146,90 C295.1@18.87,90 18.895,89.975 v1(19.572,89.975)
NetC296_1: C296.1 J20.258 R234.2 R235.2 | length 3.6
  1_Top w0.25: J20.258@18.4,113.475 v1(19.602,113.475)
  16_Bottom w0.3: R234.2@17.2,113.45 R235.2@18.07,113.45 18.12,113.5 C296.1@18.87,113.5 19.577,113.5 v1(19.602,113.475)
NetC310_1: C310.1 R249.2 R250.2 | length 2.5
  16_Bottom w0.25: R250.2@46.15,18.5 C310.1@47.1,18.5 ; R249.2@47,16.95 47,18.1 C310.1@47.3,18.4
NetC311_1: C311.1 R251.2 R252.2 | length 2.7
  16_Bottom w0.25: C311.1@41.5,18.6 C311.1@41.59,18.6 R251.2@42.65,18.6 ; C311.1@41.6,18.5 42,18.1 R252.2@42,17.15
NetC312_1: C312.1 R253.2 R254.2 | length 3.5
  16_Bottom w0.25: C312.1@40.7,13.6 40.8,13.5 R253.2@42.85,13.5 ; C312.1@40.7,13.7 R254.2@40.7,15.05
NetC314_1: C314.1 R255.2 R256.2 | length 2.4
  16_Bottom w0.25: R256.2@37.25,15.9 37.25,14.85 C314.1@37.3,14.8 ; C314.1@37.39,14.7 37.39,13.81 R255.2@37.7,13.5
NetC336_1: C336.1 R273.2 R274.2 | length 2.5
  16_Bottom w0.25: R274.2@69.6,18.5 C336.1@70.55,18.5 ; R273.2@70.45,16.95 70.45,18.1 C336.1@70.75,18.4
NetC337_1: C337.1 R275.2 R276.2 | length 2.7
  16_Bottom w0.25: C337.1@64.95,18.6 C337.1@65.04,18.6 R275.2@66.1,18.6 ; C337.1@65.05,18.5 65.45,18.1 R276.2@65.45,17.15
NetC338_1: C338.1 R277.2 R278.2 | length 3.5
  16_Bottom w0.25: C338.1@64.15,13.6 64.25,13.5 R277.2@66.3,13.5 ; C338.1@64.15,13.7 R278.2@64.15,15.05
NetC340_1: C340.1 R279.2 R280.2 | length 2.4
  16_Bottom w0.25: R280.2@60.7,15.9 60.7,14.85 C340.1@60.75,14.8 ; C340.1@60.84,14.7 60.84,13.81 R279.2@61.15,13.5
NetC362_2: C362.2 J11.2 | length 1.7
  16_Bottom w0.3: C362.2@13.577,19.825 15.097,19.825 J11.2@15.197,19.725
NetC363_2: C363.2 J11.5 | length 1.2
  16_Bottom w0.3: C363.2@14.577,17.225 J11.5@15.797,17.225
NetC364_2: C364.2 J11.8 | length 1.2
  16_Bottom w0.3: J11.8@26.497,17.325 26.597,17.225 C364.2@27.607,17.225
NetC365_2: C365.2 J11.11 | length 1.5
  16_Bottom w0.3: J11.11@27.197,19.925 27.297,19.825 C365.2@28.607,19.825
NetC510_1: C510.1 C511.1 C512.1 C513.1 C514.1 C515.1 L17.1 U27.4 U27.7 U27.11 U27.15 U27.16 U27.20 U27.24 | length 24.1
  1_Top w0.25: v2(59.741,128.391) 59.759,128.391 60,128.15 U27.20@60.5,128.15 ; v2(60.45,125.6) 60.45,126.1 U27.24@60.5,126.15 ; U27.16@62.2,129.35 62.2,129.85 v2@62.45,130.1 ; v2(62.425,130.075) v2@62.45,130.1 ; U27.4@62.7,125.45 62.7,124.75 v2(62.75,124.7) ; U27.15@62.7,129.35 62.7,129.85 v2@62.45,130.1 ; U27.7@64.4,126.15 64.4,125.65 v2(64.45,125.6) ; U27.11@64.4,128.15 64.8,128.15 65.15,128.5 v2(65.35,128.5)
  16_Bottom w0.25: v2@59.75,128.4 59.95,128.2 C513.1@60.45,128.2 ; v2(60.45,125.6) 60.5,125.65 C514.1@60.5,126.15 ; v2@62.35,130.1 62.55,129.9 C512.1@62.55,129.4 ; C515.1@62.7,125.45 62.7,124.75 v2(62.75,124.7) ; v2@62.85,124.7 L17.1@64.4,124.7 ; C511.1@64.3,126.25 64.3,125.75 v2(64.45,125.6) ; C510.1@64.65,128.2 64.95,128.2 v2@65.25,128.5
  16_Bottom w0.3: v2(60.45,125.6) 60.45,124.75 v2@62.7,124.75 ; C513.1@60.45,128.2 60.45,126.2 C514.1@60.5,126.15 ; v2(62.425,130.075) 65.075,130.075 65.1,130.1 65.35,129.85 v2(65.35,128.5) ; C511.1@64.3,126.25 64.3,127.1 64.65,127.45 C510.1@64.65,128.2 ; L17.1@64.4,124.7 64.4,125.55 v2(64.45,125.6)
NetC524_2: C524.2 J15.1 | length 4.6
  1_Top w0.17: J15.1@45,126.8 45.5,126.3 C524.2@49.4,126.3
NetC525_1: C525.1 C526.1 C527.1 C528.1 C529.1 C530.1 L18.1 U28.4 U28.7 U28.11 U28.15 U28.16 U28.20 U28.24 | length 24.3
  1_Top w0.25: v2(51.56,125.752) 51.56,125.69 51.6,125.65 51.85,125.9 U28.11@52.3,125.9 ; v2(52,128.45) 52.1,128.45 52.3,128.25 U28.7@52.3,127.9 ; v2(53.7,129.45) 54,129.15 U28.4@54,128.6 ; v2(53.9,123.95) 54,124.05 U28.15@54,124.7 ; v2@54.5,124.05 U28.16@54.5,124.7 ; U28.20@56.2,125.9 56.95,125.9 v2(56.95,126) ; U28.24@56.2,127.9 56.725,127.9 57,128.175 v2(57,128.3)
  1_Top w0.3: v2@54.5,123.95 v2@54.5,124.05
  16_Bottom w0.25: v2@51.5,125.75 51.6,125.85 C530.1@52.2,125.85 ; C529.1@52.2,127.55 52.2,128.25 v2(52,128.45) 52.05,128.5 L18.1@52.05,129.65 53.5,129.65 v2(53.7,129.45) 54,129.15 C528.1@54,128.75 ; v2@53.8,123.95 54.2,124.35 54.2,124.65 ; v2(53.9,123.95) v2(54.5,123.95) ; C526.1@56.3,125.85 56.8,125.85 v2@56.9,125.95 ; C527.1@56.5,127.85 56.95,127.85
  16_Bottom w0.3: C529.1@52.2,127.55 C530.1@52.2,125.85 52.2,125 52.55,124.65 54.2,124.65 54.2,125.1 56.05,125.1 56.3,125.35 C526.1@56.3,125.85 ; v2(56.95,126) 56.95,127.85 56.95,128.25 v2(57,128.3)
NetC531_2: C531.2 J16.1 | length 11.4
  1_Top w0.17: J16.1@45.5,136.16 45.575,136.085 45.575,132.275 46.25,131.6 48.75,131.6 49.946,130.404 C531.2@49.946,128.029
NetC532_2: C532.2 C533.2 C534.2 C535.2 C536.2 L19.1 R339.1 U30.7 U30.15 U30.24 | length 21.9
  1_Top w0.17: v2(58.6,137.4) U30.15@59.545,137.4 ; U30.24@62.745,135.2 62.745,134.455 v2(62.8,134.4) ; U30.7@62.745,139.1 62.745,139.945 R339.1@62.9,140.1
  1_Top w0.3: R339.1@62.9,140.1 v3(63.625,140.1)
  16_Bottom w0.3: v2@58.6,137.3 58.7,137.4 C535.2@59.6,137.4 ; v2(62.8,134.4) C533.2@62.8,135 ; C536.2@63.6,135 C533.2@62.8,135 ; v3(63.625,140.1) 63.445,139.92 C534.2@63.445,139.075 ; L19.1@64.445,139.075 C534.2@63.445,139.075 ; C533.2@62.8,135 61.6,135 61.45,135.15 58.35,135.15 57.8,135.7 57.8,137.1 58.1,137.4 v2(58.6,137.4) 58.6,138.5 59.175,139.075 C532.2@62.645,139.075 C534.2@63.445,139.075
NetC544_2: C544.2 U32.4 | length 1.4
  1_Top w0.17: C544.2@90.9,112.5 90.9,111.55 U32.4@91.25,111.2
NetC545_2: C545.2 U32.5 | length 1.2
  1_Top w0.17: U32.5@88.61,111.1 U32.5@88.71,111.2 ; U32.5@89.01,111.5 89.1,111.59 C545.2@89.1,112.5
NetC547_2: C547.2 L21.1 U31.12 | length 2.5
  1_Top w0.2: U31.12@53.795,142.126 53.795,143.395 v2(53.8,143.4)
  16_Bottom w0.2: L21.1@53.1,143.4 v2(53.8,143.4) C547.2@54.3,143.4
NetC562_2: C562.2 J22.4 J22.7 | length 6.4
  16_Bottom w0.3: J22.7@90.4,12.795 90.4,11.045 90.4,10.8 90.9,10.3 93.4,10.3 93.9,10.8 J22.4@93.9,11.295
NetC563_2: C563.2 R343.2 U33.15 | length 2.4
  1_Top w0.2: C563.2@84.26,22.125 R343.2@84.26,22.885 ; R343.2@84.3,22.725 84.375,22.8 U33.15@85.925,22.8
NetC564_2: C564.2 U33.21 X1.1 | length 10.5
  1_Top w0.17: X1.1@84.15,15.775 82.69,15.775 C564.2@82.675,15.76 82.335,16.1 82.335,18.435 82.9,19 86.7,19 87.1,19.4 U33.21@87.1,20.425
NetC565_2: C565.2 U33.22 X1.3 | length 4.2
  1_Top w0.17: X1.3@86.6,17.44 86.62,17.46 C565.2@87.4,17.46 87.5,17.56 U33.22@87.5,20.425
  1_Top w0.3: X1.3@86.25,17.425 86.25,17.44 X1.3@86.6,17.44
NetC569_1: C569.1 U33.2 U33.3 U33.30 U33.33 U33.39 U33.48 | length 35.4
  1_Top w0.17: U33.39@94.675,21.2 94.675,21.05 95.1,20.625 v2(95.5,20.625) ; U33.48@94.675,24.8 95.525,24.8 95.75,25.025 v2(96.5,25.025)
  1_Top w0.2: v2(85.1,27.825) 85.1,27.625 85.075,27.6 U33.3@85.925,27.6 ; v2@85.225,28 U33.2@85.925,28 ; v2(90.6,19.3) 90.675,19.3 90.7,19.325 U33.30@90.7,20.425 90.7,21.125 90.825,21.25 91.645,21.25 91.775,21.25 91.9,21.125 U33.33@91.9,20.425
  16_Bottom w0.2: v2(85.1,27.825) 85.1,28.325 85.2,28.425 86.9,28.425 88.2,29.725 90.8,29.725 93.5,27.025 95.3,27.025 95.9,26.425 95.9,25.025 ; v2@85.2,27.825 C569.1@85.94,27.825 ; v2(90.6,19.3) 94.975,19.3 95.5,19.825 v2(95.5,20.625) 95.5,24.825 95.7,25.025 95.9,25.025 ; v2(96.5,25.025) 95.9,25.025
NetD5_1: D5.1 R266.1 | length 1
  1_Top w0.2: R266.1@50.65,29.4 D5.1@51.6,29.4
NetD6_1: D6.1 R267.1 | length 1.3
  1_Top w0.2: R267.1@50.65,30.7 D6.1@51.8,30.7 D6.1@51.9,30.7
NetD7_1: D7.1 R268.1 | length 1
  1_Top w0.2: R268.1@50.65,32 D7.1@51.6,32
NetD8_1: D8.1 R269.1 | length 1.2
  1_Top w0.25: R269.1@50.65,33.3 D8.1@51.8,33.3
NetD9_1: D9.1 R271.1 | length 1
  1_Top w0.25: R271.1@50.65,34.6 D9.1@51.6,34.6
NetD10_1: D10.1 R290.1 | length 1
  1_Top w0.2: R290.1@74.1,29.4 D10.1@75.05,29.4
NetD11_1: D11.1 R291.1 | length 1.3
  1_Top w0.2: R291.1@74.1,30.7 D11.1@75.25,30.7 D11.1@75.35,30.7
NetD12_1: D12.1 R292.1 | length 1
  1_Top w0.2: R292.1@74.1,32 D12.1@75.05,32
NetD13_1: D13.1 R294.1 | length 1
  1_Top w0.2: R294.1@74.1,33.3 74.95,33.3 D13.1@75.05,33.2
NetD14_1: D14.1 R296.1 | length 1.3
  1_Top w0.2: R296.1@74.1,34.6 D14.1@75.35,34.6
NetJ1_2: J1.2 R32.1 | length 10.2
  16_Bottom w0.25: J1.2@4.87,119.4 4.87,117.33 7,115.2 7,111.089 6.6,110.689 R32.1@6.6,110.2
NetJ2_2: J2.2 R73.1 | length 2
  1_Top w0.25: J2.2@160.235,59.13 160.235,59.93 160.435,60.13 R73.1@161.335,60.13
NetJ2_4: J2.4 R76.1 | length 2.4
  1_Top w0.25: J2.4@162.595,59.305 162.595,60.165 162.96,60.53 R76.1@163.935,60.53
NetJ2_6: J2.6 R78.1 | length 2.3
  1_Top w0.25: J2.6@165.135,59.33 165.135,60.13 165.535,60.53 R78.1@166.435,60.53
NetJ2_8: J2.8 R80.1 | length 2.3
  1_Top w0.25: J2.8@167.235,59.23 167.235,59.43 168.185,60.38 R80.1@168.935,60.38
NetJ2_10: J2.10 R81.1 | length 2.1
  1_Top w0.25: J2.10@170.335,59.33 170.435,59.33 170.71,59.605 170.71,60.43 R81.1@171.535,60.43
NetJ3_1: J3.1 R118.2 R127.2 | length 4.6
  16_Bottom w0.25: R127.2@150.545,107.25 151.645,107.25 152.395,108 R118.2@153.245,108 154.145,108.9 J3.1@154.145,109.25
NetJ6_13: J6.13 R246.2 | length 2.2
  1_Top w0.25: R246.2@113.45,14.4 113.45,14.35 113.75,14.05 J6.13@113.75,12.29
NetJ6_14: J6.14 R247.2 | length 2.4
  1_Top w0.25: R247.2@112.55,14.4 113.25,13.7 J6.14@113.25,12.29
NetJ6_18: J6.18 R244.2 | length 2.3
  1_Top w0.25: J6.18@111.25,12.29 111.25,14 R244.2@111.65,14.4
NetJ6_19: J6.19 R245.2 | length 2.1
  1_Top w0.25: J6.19@110.75,12.29 R245.2@110.75,14.4
NetJ11_13: J11.13 R304.1 U11.17 | length 34.7
  1_Top w0.2: U11.17@25.012,29.625 25.424,29.625 25.8,29.25 26.1,29.25 v2(26.2,29.15) 26.3,29.25 R304.1@27,29.25
  7_int6_(sign) w0.15: v2(26.2,29.15) 30.95,29.15 33.2,26.9 33.2,9.9 28.63,5.33 J11.13@28.63,4.3
NetJ11_14: J11.14 R297.2 | length 1.1
  16_Bottom w0.3: R297.2@27.187,1.825 J11.14@28.297,1.825
NetJ11_16: J11.16 R298.2 | length 1.3
  16_Bottom w0.3: J11.16@13.697,4.225 R298.2@14.987,4.225
NetJ11_17: J11.17 R307.1 U11.15 | length 45.1
  1_Top w0.2: U11.15@25.012,28.625 25.24,28.625 26.1,27.765 v2@26.1,27.75 ; v2(26.2,27.75) R307.1@27,27.75
  7_int6_(sign) w0.15: J11.17@13.593,1.76 16.76,1.76 21.7,6.7 21.7,12.6 23.8,14.7 28.6,14.7 32,18.1 32,25.6 29.85,27.75 v2(26.2,27.75)
NetJ12_2: J12.2 R329.1 | length 3.2
  1_Top w0.3: J12.2@104.08,30.1 104.08,32.305 104.06,32.325 104.36,32.625 R329.1@104.86,32.625
NetJ14_B17: J14.B17 J14.B31 J14.B48 | length 39.1
  16_Bottom w0.3: J14.B48@62.6,152 62.6,153.3 62.7,153.4 79.6,153.4 ; J14.B31@79.6,150 79.6,153.4 ; J14.B17@93.6,150 93.6,153.3 93.5,153.4 79.6,153.4
NetJ17_1: J17.1 U31.10 | length 6.6
  1_Top w0.17: U31.10@52.495,142.126 52.495,140.805 53.7,139.6 J17.1@53.7,136
NetJ18_1: J18.1 R340.2 U31.9 | length 3
  1_Top w0.17: J18.1@48.97,142.3 50.7,142.3 R340.2@50.9,142.1 50.926,142.126 U31.9@51.845,142.126
NetJ19_1: J19.1 R341.2 U31.7 | length 5.9
  1_Top w0.17: J19.1@48.97,145.4 49.27,145.7 R341.2@50.7,145.7 52,145.7 52.495,146.195 U31.7@52.495,148.226
NetQ1_4: Q1.4 R2.2 | length 1.1
  1_Top w0.25: R2.2@127.31,101.6 128.345,101.6 Q1.4@128.41,101.535
NetQ2_2: Q2.2 R1.1 | length 1.2
  1_Top w0.25: R1.1@125.59,104.87 126.645,104.87 Q2.2@126.715,104.94
NetQ5_1: Q5.1 Q6.3 R4.1 | length 3.7
  1_Top w0.25: Q6.3@132.7,105.3 134.81,105.3 Q5.1@135.11,105.6 ; Q5.1@135.01,105.55 R4.1@135.01,106.7
NetQ5_3: Q5.3 R6.1 | length 1.4
  1_Top w0.25: Q5.3@137.01,104.6 137.01,105.4 R6.1@137.41,105.8
NetQ6_1: Q6.1 R7.1 R9.2 | length 2.7
  1_Top w0.25: R7.1@130.5,103.65 131.46,103.65 Q6.1@131.71,103.4
  1_Top w0.3: Q6.1@131.75,103.3 131.75,103.22 R9.2@132.66,102.31
NetQ7_1: Q7.1 R10.1 | length 1.4
  1_Top w0.25: R10.1@136.01,108.4 136.4,108.79 Q7.1@136.4,109.6
NetQ7_3: Q7.3 R11.1 | length 0.9
  1_Top w0.25: R11.1@133.51,110.6 134.35,110.6 Q7.3@134.4,110.55
NetQ8_4: Q8.4 R14.2 | length 1.3
  1_Top w0.25: R14.2@120.27,149.05 Q8.4@121.57,149.05
NetQ9_4: Q9.4 R15.2 | length 1.3
  1_Top w0.25: R15.2@124.97,149.25 125.55,149.25 125.815,148.985 Q9.4@126.2,148.985
NetQ10_2: Q10.2 R12.1 | length 1.2
  1_Top w0.25: R12.1@119.67,153.25 Q10.2@120.855,153.25
NetQ11_2: Q11.2 R13.1 | length 1.2
  1_Top w0.25: R13.1@124.37,153.35 124.42,153.3 Q11.2@125.585,153.3
NetQ12_4: Q12.4 R19.2 | length 1.3
  1_Top w0.25: R19.2@115.77,148.95 115.87,149.05 116.895,149.05 Q12.4@117.01,148.935
NetQ13_4: Q13.4 R114.2 | length 1.9
  16_Bottom w0.25: R114.2@155.05,101.94 155.095,101.895 155.095,100.1 Q13.4@155.145,100.05
NetQ15_1: Q15.1 Q19.3 R124.2 | length 4.2
  1_Top w0.25: Q15.1@146.045,104.35 146.545,103.85 v3@146.745,103.85
  16_Bottom w0.25: R124.2@146.045,106.05 146.13,105.965 146.13,105.22 146.55,104.8 Q19.3@147.195,104.8 ; v3(146.945,103.75) 146.945,104.55 Q19.3@147.195,104.8 ; Q19.3@147.245,104.8 Q19.3@147.195,104.8
NetQ15_3: Q15.3 R117.1 | length 1.6
  1_Top w0.25: R117.1@146.395,107.45 146.69,107.45 147.045,107.095 Q15.3@147.045,106.25
NetQ16_3: Q16.3 R116.1 | length 2
  16_Bottom w0.3: Q16.3@154.145,104.05 154.93,104.05 155.18,103.8 R116.1@155.18,102.91
NetQ19_1: Q19.1 R127.1 | length 1.5
  16_Bottom w0.25: Q19.1@149.245,105.75 149.595,106.1 R127.1@149.595,107.15
NetQ20_4: Q20.4 R130.2 | length 1.3
  16_Bottom w0.3: Q20.4@166.57,140 166.57,141.27 R130.2@166.6,141.3
NetQ21_4: Q21.4 R136.2 | length 1.2
  16_Bottom w0.3: Q21.4@166.1,116.07 R136.2@166.1,117.3
NetQ22_1: Q22.1 R134.1 R138.2 | length 6.4
  1_Top w0.3: v3(165.9,120.7) 167.35,120.7 168.05,120 v3(168.05,120.1)
  16_Bottom w0.3: R134.1@165,122.6 165.05,122.55 Q22.1@165.05,121.5 165.85,120.7 v3(165.9,120.7) ; v3(168.05,120.1) 168.175,120.1 168.925,119.35 R138.2@168.925,118.95
NetQ22_3: Q22.3 R135.1 | length 1
  16_Bottom w0.3: R135.1@165.1,119.2 165.4,119.5 Q22.3@166,119.5
NetQ23_1: Q23.1 Q24.3 R133.1 | length 4.1
  16_Bottom w0.3: R133.1@167.9,122.6 168.6,121.9 Q23.1@169.15,121.9 169,122.05 Q24.3@169,124.4
NetQ23_3: Q23.3 R138.1 | length 1.3
  16_Bottom w0.3: R138.1@169.725,118.95 169.725,119.525 Q23.3@170.1,119.9 Q23.3@170.331,119.9
NetR21_2: R21.2 R22.2 R24.2 R32.2 U2.55 | length 7.1
  16_Bottom w0.25: R32.2@6.7,109.16 6.74,109.2 R21.2@7.8,109.2 R22.2@8.9,109.2 9.54,109.2 9.7,109.36 9.7,110.46 R24.2@10.1,110.86 ; U2.55@8.65,106.91 8.65,107.71 9,108.06 R22.2@9,109.16
NetR29_1: R29.1 U2.58 | length 2.5
  16_Bottom w0.25: U2.58@10.15,106.91 10.15,107.51 10.6,107.96 10.9,107.96 R29.1@11.6,108.66
NetR31_1: R31.1 U2.51 | length 2.5
  16_Bottom w0.25: R31.1@5.7,109.06 6.375,108.385 6.375,107.785 6.65,107.51 U2.51@6.65,106.91
NetR33_2: R33.2 U2.61 | length 3.4
  16_Bottom w0.25: U2.61@11.65,106.91 11.65,107.41 11.9,107.66 13.4,107.66 13.7,107.96 R33.2@13.7,108.56
NetR34_1: R34.1 U2.50 | length 1.5
  16_Bottom w0.25: R34.1@5.5,108.16 5.5,108.06 6.025,107.535 6.15,107.41 U2.50@6.15,106.91
NetR35_1: R35.1 U2.60 | length 2.9
  16_Bottom w0.25: U2.60@11.15,106.91 11.15,107.51 11.8,108.16 12.7,108.16 12.8,108.26 R35.1@12.8,108.56
NetR36_1: R36.1 R37.2 R39.2 U3.63 | length 5.9
  1_Top w0.25: R36.1@131.09,120.27 R37.2@131.09,121.47
  1_Top w0.254: U3.63@127.265,122.895 128.565,122.895 R39.2@128.865,122.595 ; R39.2@128.865,122.67 R39.2@128.865,122.595 ; R37.2@131.065,121.495 129.565,121.495 128.865,122.195 R39.2@128.865,122.595
NetR43_1: R43.1 U3.66 | length 1.8
  1_Top w0.25: U3.66@127.24,124.41 128.145,124.41 R43.1@128.795,125.06
NetR46_2: R46.2 U3.69 | length 2.1
  1_Top w0.254: U3.69@127.265,125.895 127.665,125.895 128.065,126.295 128.065,126.795 128.265,126.995 R46.2@128.665,126.995
NetR47_1: R47.1 U3.58 | length 1.7
  1_Top w0.254: U3.58@127.265,120.395 128.165,120.395 R47.1@128.765,119.795
NetR48_1: R48.1 U3.68 | length 1.7
  1_Top w0.254: U3.68@127.265,125.395 127.865,125.395 R48.1@128.665,126.195
NetR49_2: R49.2 R50.2 R52.2 U4.55 | length 6.1
  16_Bottom w0.25: R49.2@7.295,66.45 7.395,66.35 R50.2@8.295,66.35 8.695,66.35 ; U4.55@8.995,64.55 8.995,66.35 ; R52.2@9.595,68.35 9.095,67.85 9.095,66.35 8.995,66.35 ; 8.695,66.35 8.995,66.35 ; 8.695,66.35 8.995,66.35
NetR57_1: R57.1 U4.58 | length 2.1
  16_Bottom w0.25: U4.58@10.495,64.65 10.495,64.914 ; U4.58@10.5,64.5 10.5,65.455 10.895,65.85 R57.1@10.895,66.15
NetR60_2: R60.2 U4.61 | length 2
  16_Bottom w0.25: U4.61@11.995,64.55 11.995,64.97 12.795,65.77 R60.2@12.795,66.2
NetR61_1: R61.1 U4.50 | length 2.5
  16_Bottom w0.25: R61.1@5.295,66.55 5.295,66.15 6.5,64.945 U4.50@6.5,64.5
NetR62_1: R62.1 U4.60 | length 1.6
  16_Bottom w0.25: U4.60@11.495,64.75 11.495,65.35 11.895,65.75 R62.1@11.895,66.2
NetR63_2: R63.2 R64.2 R66.2 R73.2 R76.2 R78.2 R80.2 R81.2 U5.55 | length 17.8
  1_Top w0.25: R73.2@161.335,61.13 161.335,61.33 161.635,61.63 163.635,61.63 R76.2@163.835,61.43 ; R76.2@163.935,61.33 163.935,61.42 164.025,61.42 164.335,61.73 166.435,61.73 ; R78.2@166.435,61.23 166.435,61.63 ; R78.2@166.435,61.33 166.435,61.63 ; R81.2@171.535,61.23 171.535,61.723 171.128,62.13 v3(170.035,62.13) 169.185,61.28 R80.2@168.935,61.28 168.935,61.33 168.835,61.33 168.435,61.73 166.435,61.73 ; 166.435,61.63 166.435,61.73
  16_Bottom w0.25: U5.55@169.185,62.306 v3@169.935,62.306 ; v3@170.033,62.13 v3@170.035,62.132 ; v3(170.035,62.13) v3@170.035,62.132 ; R66.2@171.435,62.73 171.011,62.306 v3@169.935,62.306 ; R66.2@171.535,62.73 171.535,63.53 R63.2@171.835,63.83 ; R63.2@171.935,63.73 172.835,63.73 R64.2@173.035,63.93 ; v3@169.935,62.306 169.934,62.305 170.035,62.204 v3@170.035,62.132
NetR71_1: R71.1 U5.58 | length 1.9
  16_Bottom w0.25: U5.58@169.185,60.806 170.559,60.806 R71.1@170.935,60.43
NetR75_2: R75.2 U5.61 | length 2.1
  16_Bottom w0.25: U5.61@169.185,59.306 170.059,59.306 170.235,59.13 170.235,58.83 R75.2@170.735,58.33
NetR77_1: R77.1 U5.50 | length 1.9
  16_Bottom w0.25: U5.50@169.185,64.806 169.711,64.806 170.335,65.43 R77.1@170.335,65.83 R77.1@170.335,65.93
NetR79_1: R79.1 U5.60 | length 1.9
  16_Bottom w0.25: U5.60@169.185,59.806 170.259,59.806 R79.1@170.835,59.23
NetR82_2: R82.2 R83.1 | length 3
  16_Bottom w0.25: v3(4.5,74) 4.5,74.775 R83.1@5,75.275 ; v3(5.3,74) 5.4,74.1 R82.2@6.75,74.1
  other v3: 3.7,74 3.7,74.8 3.7,75.6
NetR89_2: R89.2 U6.28 | length 1.9
  16_Bottom w0.25: U6.28@11.225,84.75 11.916,84.75 12.266,85.1 R89.2@12.6,85.1 12.7,85.1 12.7,85 R89.2@12.5,85
NetR90_1: R90.1 R91.2 R93.2 U7.63 | length 5.8
  1_Top w0.25: U7.63@152.445,119.2 153.57,119.2 ; R90.1@156.295,116.56 R91.2@156.295,117.76
  1_Top w0.3: 153.57,119.2 154.11,119.2 R93.2@154.17,119.26 154.17,119.16 155.57,117.76 R91.2@156.295,117.76
NetR97_1: R97.1 U7.66 | length 1.8
  1_Top w0.25: U7.66@152.445,120.7 153.35,120.7 R97.1@154,121.35
NetR100_2: R100.2 U7.59 | length 2.1
  1_Top w0.25: U7.59@152.445,117.2 153.33,117.2 153.87,116.66 R100.2@153.87,116.16
NetR101_2: R101.2 U7.69 | length 2.3
  1_Top w0.25: U7.69@152.445,122.2 153.01,122.2 153.37,122.56 153.37,122.785 R101.2@154.045,123.46
NetR102_1: R102.1 U7.58 | length 2.8
  1_Top w0.25: U7.58@152.445,116.7 152.93,116.7 153.27,116.36 153.27,115.46 153.67,115.06 R102.1@154.07,115.06
NetR103_1: R103.1 U7.68 | length 1.9
  1_Top w0.25: U7.68@152.445,121.7 153.21,121.7 153.97,122.46 R103.1@154.045,122.46
NetR111_2: R111.2 U8.28 | length 1.9
  1_Top w0.25: U8.28@124.35,136.5 124.831,136.5 125.831,135.5 R111.2@125.85,135.5
NetR113_1: R113.1 R120.2 U9.3 | length 3.1
  1_Top w0.25: U9.3@153.495,102.575 153.65,102.73 155.225,102.73 R113.1@155.345,102.85 ; R113.1@155.345,102.75 R113.1@155.345,102.8 R113.1@155.345,102.85 ; R120.2@155.345,103.9 R113.1@155.345,102.85
NetR120_1: R120.1 R121.2 U9.4 | length 3.4
  1_Top w0.25: U9.4@153.495,105.525 155.245,105.525 R121.2@155.245,106.05 ; R120.1@155.345,104.8 R121.2@155.345,105.95
NetR122_2: R122.2 U9.1 | length 1.2
  1_Top w0.25: R122.2@150.445,102.7 151.595,102.7 U9.1@151.645,102.75
NetR123_2: R123.2 U9.6 | length 1.8
  1_Top w0.25: U9.6@151.595,105.525 151.595,107 R123.2@151.845,107.25
NetR128_1: R128.1 SW1.1 | length 1.4
  16_Bottom w0.3: R128.1@168.5,139.9 169.6,139.9 SW1.1@169.8,139.7
NetR141_1: R141.1 U10.F11 U10.F12 | length 2.8
  1_Top w0.25: U10.F11@152.155,79.83 U10.F12@153.425,79.83 154.925,79.83
NetR149_1: R149.1 U10.J5 | length 2.2
  1_Top w0.3: U10.J5@144.535,76.02 v3(145.17,76.655)
  16_Bottom w0.25: 144.77,76.695 145.13,76.695 v3(145.17,76.655)
  16_Bottom w0.254: R149.1@144.36,75.985 144.36,76.285 144.77,76.695
NetR149_2: R149.2 U10.K5 | length 1.8
  1_Top w0.3: v3(143.9,74.115) U10.K5@144.535,74.75
  16_Bottom w0.254: v3(143.9,74.115) 143.9,74.6 R149.2@144.185,74.885
NetR150_2: R150.2 U10.G4 | length 2.2
  1_Top w0.25: v3(142.66,77.875) 143.265,78.481 U10.G4@143.265,78.56
  16_Bottom w0.25: v3@142.56,77.776 v3(142.66,77.875) v3@142.845,77.875 ; v3@142.845,77.875 v3@142.965,77.995
  16_Bottom w0.254: v3@142.965,77.995 143.165,78.195 R150.2@143.165,78.695
NetR151_1: R151.1 U10.K6 | length 2
  1_Top w0.3: v3(145.17,74.115) U10.K6@145.805,74.75
  16_Bottom w0.25: v3(145.17,74.115) 145.59,74.535 R151.1@146.06,74.535
NetR153_1: R153.1 U10.G5 | length 2.3
  1_Top w0.25: v3(143.86,79.175) 144.475,78.56 U10.G5@144.535,78.56
  16_Bottom w0.254: v3(143.86,79.175) 144.185,79.175 144.565,78.795 R153.1@144.565,78.295
NetR154_1: R154.1 U10.G6 | length 2.1
  1_Top w0.25: v3(145.299,77.936) 145.805,78.443 U10.G6@145.805,78.56
  16_Bottom w0.25: v3@145.299,77.954 v3(145.299,77.936) 145.499,77.936 145.54,77.895 R154.1@146.24,78.595
NetR155_1: R155.1 U23.F11 U23.F12 | length 3.4
  1_Top w0.25: R155.1@140.02,153.12 140.765,152.375 U23.F12@140.765,151.285 U23.F11@140.765,150.015
NetR158_1: R158.1 R163.2 U23.E4 | length 2.7
  1_Top w0.25: v3(138.92,140.62) 138.99,140.62 U23.E4@139.495,141.125
  16_Bottom w0.25: R158.1@138.1,141.175 138.364,141.175 v3(138.92,140.62) 139.02,140.72 R163.2@139.72,140.72
NetR162_1: R162.1 U23.F5 U23.F6 | length 3.2
  1_Top w0.25: U23.F5@140.765,142.395 v3(141.4,143.03)
  1_Top w0.3: U23.F6@140.765,143.665 v3(141.4,143.03)
  16_Bottom w0.25: R162.1@140.85,144.125 140.85,143.58 141.371,143.059 v3@141.268,142.957
NetR163_1: R163.1 U23.F4 | length 2.2
  1_Top w0.25: v3(140.12,141.72) 140.12,141.77 U23.F4@140.765,141.125
  16_Bottom w0.25: v3(140.12,141.72) 140.6,141.239 140.6,140.84 R163.1@140.72,140.72
NetR166_1: R166.1 U23.J5 | length 2.2
  1_Top w0.3: v3(143.94,143.03) U23.J5@144.575,142.395
  16_Bottom w0.25: 143.9,142.63 143.9,142.99 v3(143.94,143.03)
  16_Bottom w0.254: 143.9,142.63 144.31,142.22 R166.1@144.61,142.22
NetR166_2: R166.2 U23.K5 | length 1.8
  1_Top w0.3: U23.K5@145.845,142.395 v3(146.48,141.76)
  16_Bottom w0.254: R166.2@145.71,142.045 145.995,141.76 v3(146.48,141.76)
NetR167_2: R167.2 U23.G4 | length 2.2
  1_Top w0.25: U23.G4@142.035,141.125 142.114,141.125 v3(142.72,140.52)
  16_Bottom w0.25: v3@142.6,140.825 v3@142.72,140.705 ; v3@142.72,140.705 v3(142.72,140.52) v3@142.819,140.42
  16_Bottom w0.254: R167.2@141.9,141.025 142.4,141.025 v3@142.6,140.825
NetR168_1: R168.1 U23.K6 | length 2
  1_Top w0.3: U23.K6@145.845,143.665 v3(146.48,143.03)
  16_Bottom w0.25: R168.1@146.06,143.92 146.06,143.45 v3(146.48,143.03)
NetR170_1: R170.1 U23.G5 | length 2.3
  1_Top w0.25: v3(141.42,141.72) 142.035,142.335 U23.G5@142.035,142.395
  16_Bottom w0.254: v3(141.42,141.72) 141.42,142.045 141.8,142.425 R170.1@142.3,142.425
NetR171_1: R171.1 U23.G6 | length 2.1
  1_Top w0.25: U23.G6@142.035,143.665 142.541,143.159 v3(142.641,143.159)
  16_Bottom w0.25: R171.1@142,144.1 142.7,143.4 142.659,143.359 142.659,143.159 v3(142.641,143.159)
NetR174_1: R174.1 R175.1 R177.2 U12.54 | length 4.1
  1_Top w0.25: R177.2@164.634,73.15 164.684,73.1 164.734,73.1 R175.1@165.634,73.1 ; R175.1@165.634,73.05 165.934,73.35 R174.1@166.534,73.35 ; U12.54@166.134,75.05 166.134,74.734 166.634,74.234 166.634,73.45 R174.1@166.534,73.35 ; R174.1@166.634,73.35 R174.1@166.534,73.35
NetR176_1: R176.1 U12.49 | length 2.1
  1_Top w0.25: R176.1@161.534,74.95 161.634,75.05 U12.49@163.634,75.05
NetR179_2: R179.2 R180.2 U12.50 | length 4.2
  1_Top w0.25: R179.2@161.134,73.65 161.184,73.6 R180.2@162.034,73.6 162.034,74.25 162.134,74.35 163.748,74.35 164.134,74.736 U12.50@164.134,75.05
NetR181_2: R181.2 U12.58 | length 2.2
  1_Top w0.25: U12.58@168.134,75.05 168.134,74.65 R181.2@169.434,73.35
NetR182_2: R182.2 U12.57 | length 2.4
  1_Top w0.25: U12.57@167.634,75.05 167.634,74.45 168.534,73.55 R182.2@168.534,73.15 R182.2@168.534,73.05
NetR208_1: R208.1 U14.F9 | length 2.6
  1_Top w0.3: R208.1@115.403,76.759 115.5,76.759 115.5,75.254 116,74.754 U14.F9@116,74.5
NetR209_1: R209.1 U15.F9 | length 2.5
  1_Top w0.3: R209.1@115.791,64.211 116,64.003 U15.F9@116,61.8
NetR237_2: R237.2 U1.AH7 | length 1.6
  1_Top w0.25: v1(68.675,68.4) 68.675,68.42 U1.AH7@69.194,68.939
  16_Bottom w0.3: v1(68.675,68.4) 69.05,68.025 R237.2@69.05,67.675
NetR242_1: R242.1 U16.2 | length 1
  16_Bottom w0.3: R242.1@110.25,8.3 110.55,8 U16.2@110.55,7.45
NetR243_1: R243.1 U16.3 | length 0.9
  16_Bottom w0.3: R243.1@111.05,8.3 111.2,8.15 U16.3@111.2,7.45
NetR257_2: R257.2 U17.A6 U17.B6 U17.B7 U17.B8 | length 3.3
  1_Top w0.2: R257.2@38.7,27.6 R257.2@38.8,27.7 U17.A6@40,27.7 40.2,27.7 40.45,27.45 40.6,27.45 U17.B6@40.6,27.4 U17.B7@40.6,26.8 U17.B8@40.6,26.2
NetR258_2: R258.2 U17.A9 U17.A10 U17.B9 U17.B10 | length 4.5
  1_Top w0.2: R258.2@38.8,25.4 38.9,25.3 U17.A10@40,25.3 40.175,25.3 40.475,25 U17.B10@40.6,25 ; R258.2@38.9,25.6 39.2,25.9 U17.A9@40,25.9 40.2,25.9 40.5,25.6 U17.B9@40.6,25.6 U17.B10@40.6,25.05
NetR262_2: R262.2 U18.1 | length 1.7
  1_Top w0.25: R262.2@51.8,20.1 51.85,20.15 U18.1@51.85,21.8
NetR264_1: R264.1 U17.A25 | length 1
  1_Top w0.2: R264.1@47.1,22 U17.A25@47.1,23
NetR265_1: R265.1 U17.B14 | length 2.8
  1_Top w0.1: v2(41.9,22) 41.9,22.1 42,22.2 U17.B14@42,23.6
  16_Bottom w0.15: v2(41.9,22) 42,22.1 R265.1@42,23.15
NetR270_1: R270.1 R272.2 U19.5 | length 2.5
  1_Top w0.25: R272.2@37.7,32.9 37.9,33.1 R270.1@37.9,33.9 38.1,33.9 38.7,34.5 U19.5@39.075,34.5
NetR281_2: R281.2 U20.A6 U20.B6 U20.B7 U20.B8 | length 3.3
  1_Top w0.2: R281.2@62.15,27.6 R281.2@62.25,27.7 U20.A6@63.45,27.7 63.65,27.7 63.9,27.45 64.05,27.45 U20.B6@64.05,27.4 U20.B7@64.05,26.8 U20.B8@64.05,26.2
NetR282_2: R282.2 U20.A9 U20.A10 U20.B9 U20.B10 | length 4.5
  1_Top w0.2: R282.2@62.25,25.4 63.35,25.4 U20.A10@63.45,25.3 63.7,25.05 63.733,25.05 63.783,25 U20.B10@64.05,25 ; R282.2@62.35,25.6 62.65,25.9 U20.A9@63.45,25.9 63.65,25.9 63.95,25.6 U20.B9@64.05,25.6 U20.B10@64.05,25.05
NetR286_2: R286.2 U21.1 | length 1.7
  1_Top w0.25: R286.2@75.25,20.1 75.3,20.15 U21.1@75.3,21.8
NetR288_1: R288.1 U20.A25 | length 1
  1_Top w0.2: R288.1@70.55,22 U20.A25@70.55,23
NetR289_1: R289.1 U20.B14 | length 2.4
  1_Top w0.1: v2@65.3,22.25 v2(65.3,22.1) 65.45,22.25 U20.B14@65.45,23.6
  16_Bottom w0.15: v2(65.3,22.1) 65.4,22.2 R289.1@65.4,22.65 ; v2@65.4,21.95 v2@65.45,22
NetR293_1: R293.1 R295.2 U22.5 | length 2.3
  1_Top w0.25: R295.2@61.35,32.9 61.35,33.9 R293.1@61.45,34 ; R293.1@61.55,34.1 61.95,34.5 U22.5@62.525,34.5
NetR299_1: R299.1 U11.48 | length 1
  1_Top w0.2: R299.1@17.3,27.35 17.576,27.625 U11.48@18.212,27.625
NetR301_1: R301.1 U11.42 | length 1.3
  1_Top w0.2: R301.1@17,30.45 17.4,30.45 17.576,30.625 U11.42@18.212,30.625
NetR305_1: R305.1 U11.38 | length 1.7
  1_Top w0.2: R305.1@16.6,32.75 R305.1@16.7,32.75 16.8,32.85 17.607,32.85 17.807,32.65 18.187,32.65 U11.38@18.212,32.625
NetR311_2: R311.2 U24.1 | length 1.4
  1_Top w0.3: R311.2@11.887,27.575 12.547,27.575 U24.1@13.097,27.025
NetR313_2: R313.2 U11.41 | length 1.4
  1_Top w0.2: R313.2@16.9,31.25 17.109,31.25 17.233,31.125 U11.41@18.212,31.125
NetR314_1: R314.1 R315.2 U25.8 | length 2.1
  1_Top w0.2: U25.8@10.887,34.4 10.887,33.435 R314.1@10.897,33.425
  1_Top w0.3: R315.2@9.797,33.325 9.847,33.375 R314.1@10.887,33.375
NetR316_2: R316.2 U25.6 | length 1.2
  1_Top w0.2: R316.2@8.687,34.375 9.847,34.375 U25.6@9.897,34.425
NetR317_2: R317.2 SW2.5 | length 1.5
  1_Top w0.17: R317.2@119.3,22.3 119.3,23.77 SW2.5@119.33,23.8
NetR318_2: R318.2 SW2.6 | length 1.5
  1_Top w0.3: R318.2@120.6,22.3 SW2.6@120.6,23.8
NetR319_2: R319.2 SW2.7 | length 1.5
  1_Top w0.3: SW2.7@121.87,23.8 121.9,23.77 R319.2@121.9,22.3
NetR320_1: R320.1 R322.2 U26.B2 | length 2.3
  1_Top w0.2: U26.B2@66.475,43.4 v1(66.975,42.9)
  16_Bottom w0.2: v1(66.975,42.9) 67.075,43 R320.1@67.65,43 R322.2@67.65,42.1
NetR320_2: R320.2 U1.AN14 | length 26.8
  1_Top w0.17: U1.AN14@76.194,63.939 76.261,63.939 v1(76.7,63.5)
  7_int6_(sign) w0.15: v1(69.2,43) 69.353,43.153 69.353,44.2 74.953,49.8 76.3,49.8 76.4,49.9 76.4,52.6 75.069,53.931 75.069,56.814 76.194,57.939 76.194,62.939 76.7,63.445 v1(76.7,63.5)
  16_Bottom w0.17: R320.2@68.55,43 v1(69.2,43)
NetR321_2: R321.2 U1.AU14 U26.C2 | length 22.3
  1_Top w0.17: v1(66.1,44) 66.1,44.025 U26.C2@66.475,44.4 ; v1(75.7,59.5) 75.755,59.5 U1.AU14@76.194,59.939
  7_int6_(sign) w0.15: v1@66.1,43.9 v1(66.1,44) 66.2,44.1 67.6,44.1 74.7,51.2 74.7,57.2 75.7,58.2 v1(75.7,59.5)
  16_Bottom w0.17: R321.2@65.55,43.6 65.7,43.6 v1(66.1,44)